# Altium PCB Wearable_ECG_230108U_230507R.PcbDoc (part 1 of 2)
Units mil, origin at the board's own origin, x right, y up, seen from the top; angles counter-clockwise.
Board outline 3795 x 1445 mil, 4 copper layers (Top Layer, L2_GND, L3_POWER, Bottom Layer), stack 62.449 mil thick; 68 components, 46 nets, 244 pads, 65 vias.
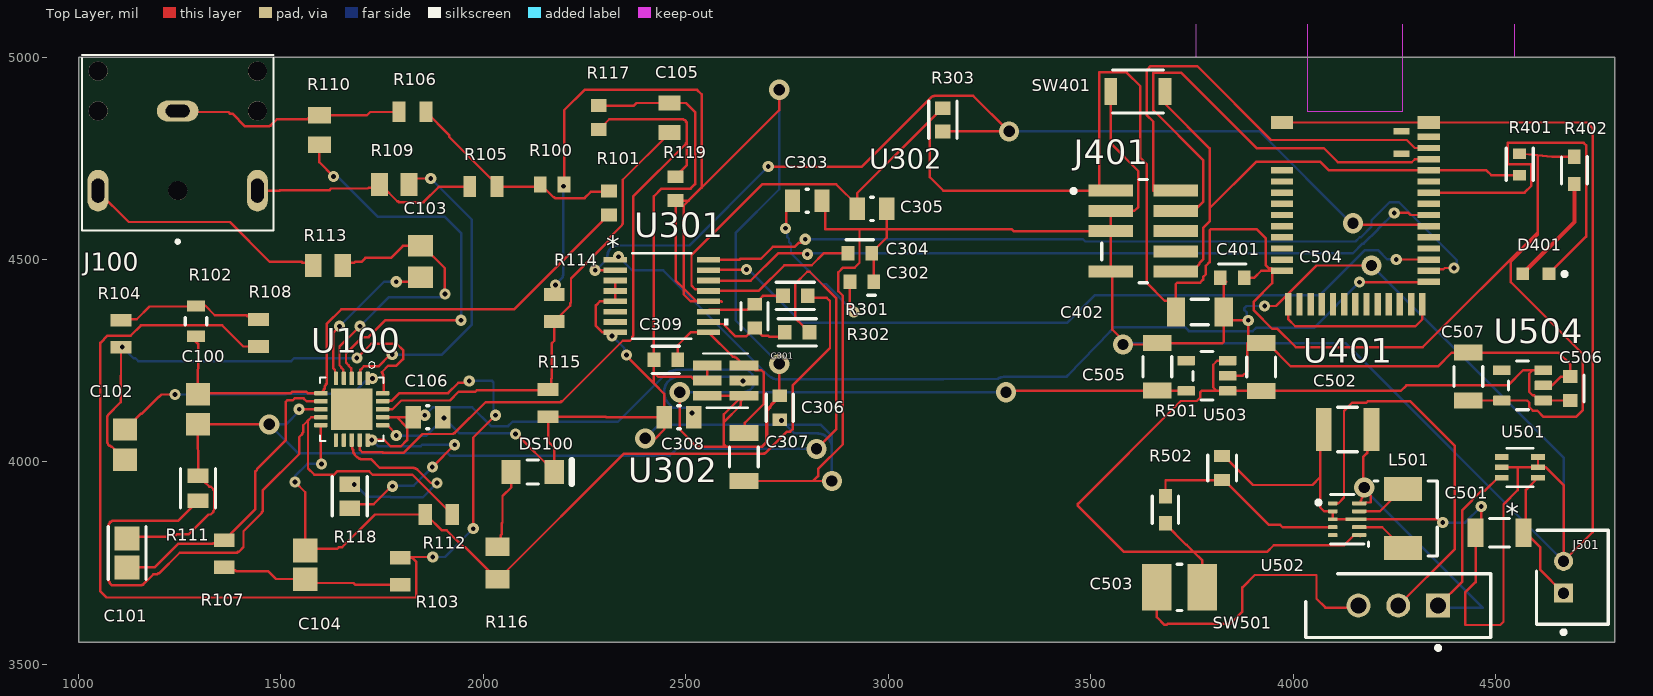
[diagram p0: Top Layer view]
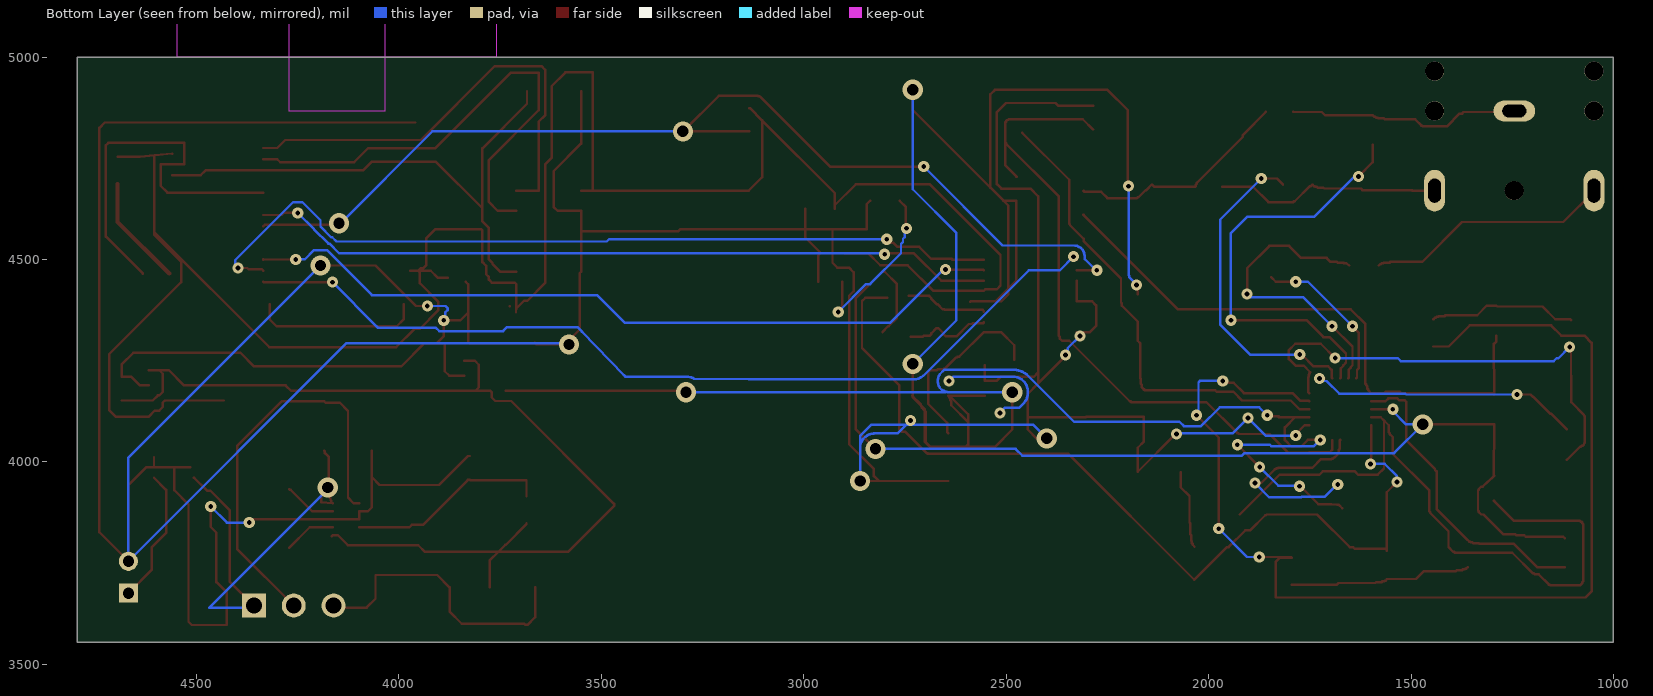
[diagram p1: Bottom Layer view, seen from below]
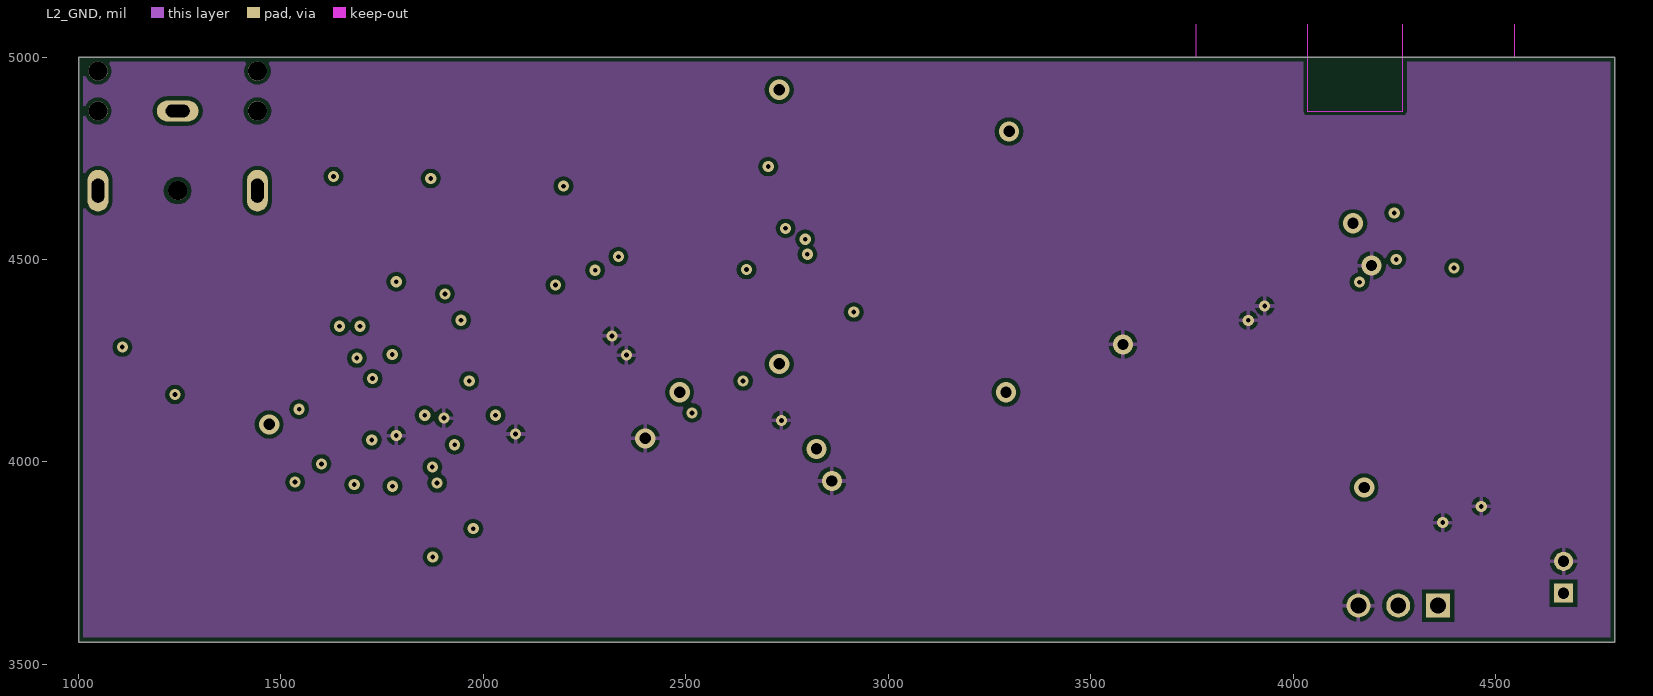
[diagram p2: L2_GND]
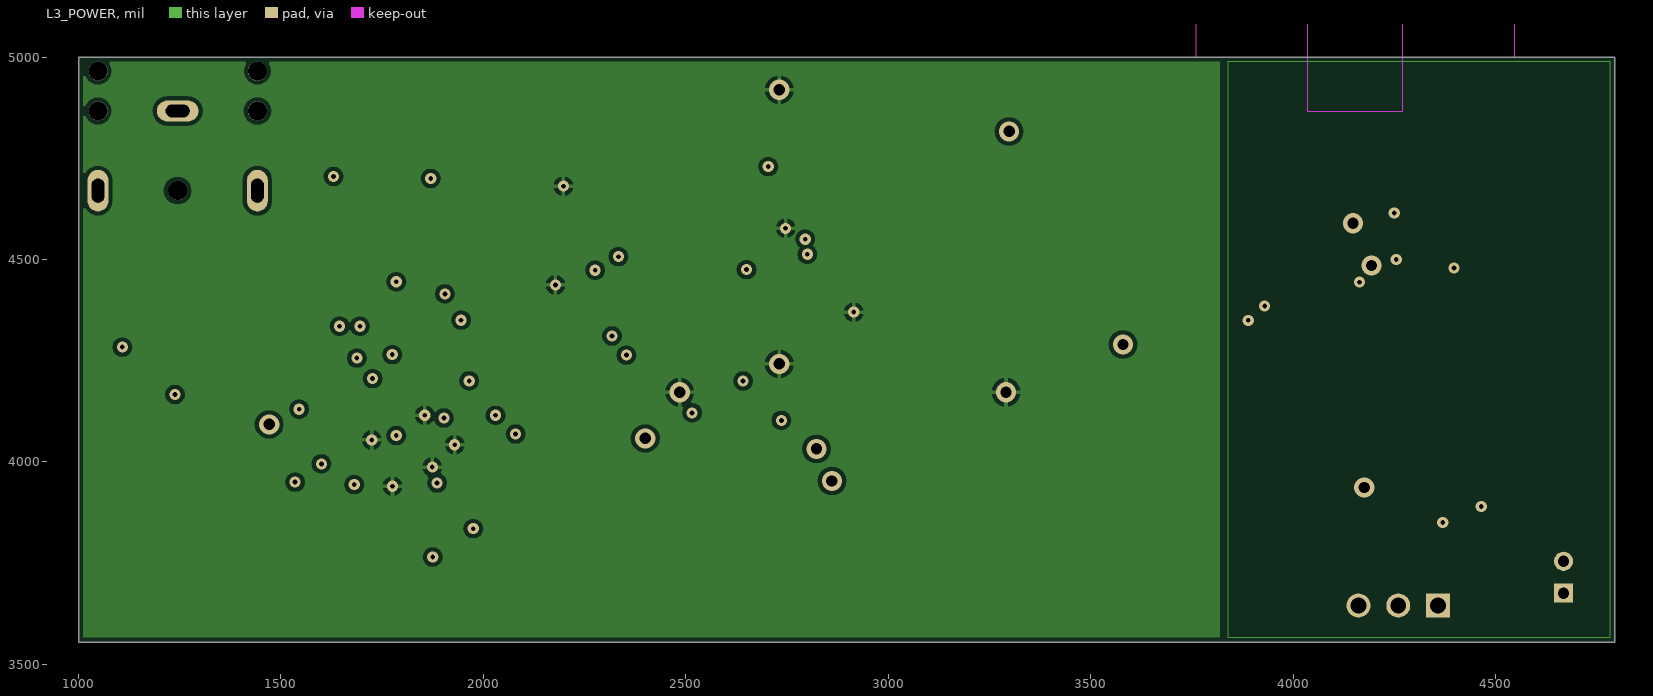
[diagram p3: L3_POWER]
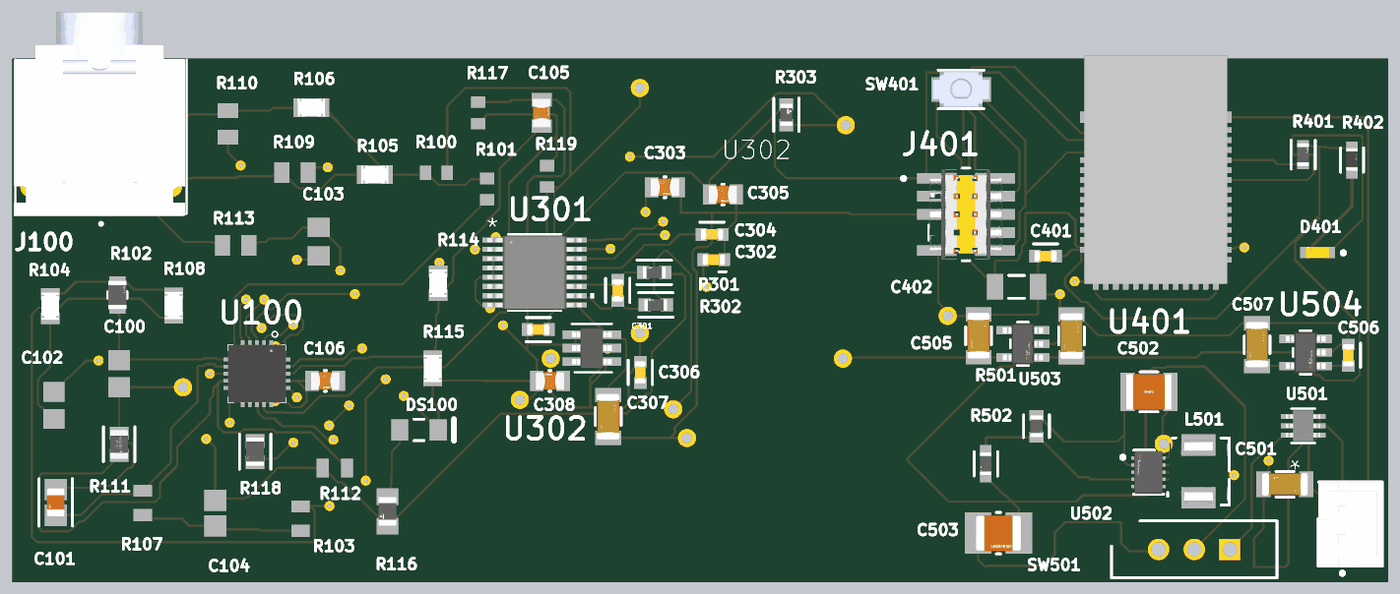
[diagram p5: 3D render of the assembled board from above, using the file's embedded part models]

## Layer stack, top to bottom
Top Solder: solder mask 0.4, Solder Resist, Dk 3.5
Top Layer: signal copper 1.378
Dielectric 2: prepreg 8.2835, PP-023, Dk 4.4
L2_GND: signal copper 0.5984
Dielectric 1: dielectric 41.9291, FR-4, Dk 4.6
L3_POWER: signal copper 0.5984
Dielectric 3: prepreg 8.2835, PP-023, Dk 4.4
Bottom Layer: signal copper 1.378
Bottom Solder: solder mask 0.4, Solder Resist, Dk 3.5

## Board outline
1000,3555 4795,3555 4795,5000 1000,5000

## Design rules (kind name [scope] priority, off if disabled: settings)
Clearance FinePitch_IC_Clearance [IsPad AND (InComponent('U100') OR InComponent('U502')) vs IsPad AND (InComponent('U100') OR InComponent('U502'))] p1: gap=7 ignorepadtopadclearanceinfootprint=FALSE
Clearance [All] p2: gap=10 ignorepadtopadclearanceinfootprint=FALSE
ComponentClearance [All] p1: gap=10 collisioncheckmode=3 verticalgap=10 showdistances=TRUE
MinimumSolderMaskSliver [All] p1: minsoldermaskwidth=7
PolygonConnect [All] p1: connectstyle=Relief reliefconductorwidth=10 reliefentries=4 polygonreliefangle="90 Angle" airgapwidth=10
RoutingLayers [All] p1: top layer_v5=TRUE mid layer 1_v5=FALSE mid layer 2_v5=FALSE bottom layer_v5=TRUE
RoutingVias FinePitch_Fanout_0p7_0p3 [(InNet('3.3V') OR InNet('ADC_CS') OR InNet('ADC_DRDY') OR InNet('DVDD_3V3') OR InNet('GND') OR InNet('MCU_RESET_N') OR InNet('MCU_STATUS_LED') OR InNet('NetC100_1') OR InNet('NetC101_2') OR InNet('NetC102_1') OR InNet('NetC102_2') OR InNet('NetC103_1') OR InNet('NetC103_2') OR InNet('NetC105_1') OR InNet('NetC301_1') OR InNet('NetC301_2') OR InNet('NetL501_1') OR InNet('NetL501_2') OR InNet('NetR103_2') OR InNet('NetR109_2') OR InNet('NetR110_2') OR InNet('NetR111_1') OR InNet('NetR117_1') OR InNet('NetR118_2') OR InNet('NetR501_1') OR InNet('NetSW501_2') OR InNet('REFOUT') OR InNet('SIGNAL_OUT') OR InNet('SPI_MISO') OR InNet('SPI_MOSI') OR InNet('SPI_SCK') OR InNet('SWDCLK') OR InNet('SWDIO') OR InNet('VBAT') OR InNet('VBAT_PROT') OR InNet('VBOOST_3V6') OR InNet('VREF_2V5')) OR InNet('NetC308_1')] p1: holewidth=11.81 width=27.56 viastyle="Through Hole" minholewidth=11.81 minwidth=27.56 maxholewidth=28 maxwidth=50 // Compact through vias for fine-pitch fanout: 0.7mm copper, 0.3mm drill, 0.2mm annulus. Fabricator capability remains to be confirmed before release.
RoutingVias [All] p2: holewidth=28 width=50 viastyle="Through Hole" minholewidth=28 minwidth=50 maxholewidth=28 maxwidth=50
SolderMaskExpansion [All] p1: expansion=0 istentingtop=FALSE
SupplyNets "Schematic Supply Nets" [InNet('GND')] p1: voltage=0.000
Width FinePitch_Escape_6mil [InNet('3.3V') OR InNet('ADC_CS') OR InNet('ADC_DRDY') OR InNet('DVDD_3V3') OR InNet('GND') OR InNet('MCU_RESET_N') OR InNet('MCU_STATUS_LED') OR InNet('NetC100_1') OR InNet('NetC101_2') OR InNet('NetC102_1') OR InNet('NetC102_2') OR InNet('NetC103_1') OR InNet('NetC103_2') OR InNet('NetC105_1') OR InNet('NetC301_1') OR InNet('NetC301_2') OR InNet('NetL501_1') OR InNet('NetL501_2') OR InNet('NetR103_2') OR InNet('NetR109_2') OR InNet('NetR110_2') OR InNet('NetR111_1') OR InNet('NetR117_1') OR InNet('NetR118_2') OR InNet('NetR501_1') OR InNet('NetSW501_2') OR InNet('REFOUT') OR InNet('SIGNAL_OUT') OR InNet('SPI_MISO') OR InNet('SPI_MOSI') OR InNet('SPI_SCK') OR InNet('SWDCLK') OR InNet('SWDIO') OR InNet('VBAT') OR InNet('VBAT_PROT') OR InNet('VBOOST_3V6') OR InNet('VREF_2V5')] p1: maxlimit=30 minlimit=6 preferedwidth=10 toplayer_prefwidth=6 midlayer1_minwidth=10 midlayer1_maxwidth=10 midlayer2_minwidth=10 midlayer2_maxwidth=10 bottomlayer_prefwidth=6 minimp=50.000000 maximp=50.000000 favimp=50.000000 // 6mil escapes on fine-pitch device nets; original 6mil minimum and 30mil maximum preserved. Power necks require widening after escape.
Width [All] p2: maxlimit=30 minlimit=6 preferedwidth=10
27 further rules are at their usual default settings.

## Classes and differential pairs
component class 05_Power_Management: C501 C502 C503 C504 C505 C506 C507 J501 L501 R501 R502 SW501 U501 U502 U503 U504
component class 04_MCU_BLE: C401 C402 D401 J401 R401 R402 SW401 U401
component class 03_ADC_Reference: C301 C302 C303 C304 C305 C306 C307 C308 C309 R301 R302 R303 U301 U302
component class 01_ECG_Input_AFE: C100 C101 C102 C103 C104 C105 C106 DS100 J100 R100 R101 R102 R103 R104 R105 R106 R107 R108 R109 R110 R111 R112 R113 R114 R115 R116 R117 R118 R119 U100

## Components (designator, comment, footprint, x,y, rotation, side; value= is the part's Value field where it differs from the comment)
C100 "0.33 uF" CAPC2013X135X45ML10T25 1295,4130 r270 top
C101 "10nF" FP-0805-L_2_01_0_2-W_1_25-IPC_A 1120,3775 r270 top
C102 "0.33 uF" CAPC2013X135X45ML10T25 1115,4042.6 r270 top
C103 "1 nF" CAPC0805(2012)100_M 1845,4495 r270 top value=1nF
C104 "1.5nF" CAPC2013X140X50ML20T25 1560,3745.43 r270 top
C105 "0.1uF" FP-CC0805-0_85-MFG 2460,4850 r90 top value="100 nF"
C106 "0.1uF" FP-CC0805-0_85-MFG 1863.19,4110.31 r0 top value="100 nF"
C301 "100nf" FP-CC0603-DA-MFG 2670,4360 r270 top value="100 nF"
C302 "100 nF, X7R" FP-CC0603-DA-MFG 2935,4445 r0 top value="100 nF"
C303 "1 µF, X7R" FP-CC0805-0_85-MFG 2800,4645 r0 top value="1 uF"
C304 "100 nF, X7R" FP-CC0603-DA-MFG 2930,4515 r0 top value="100 nF"
C305 "1 µF, X7R" FP-CC0805-0_85-MFG 2960,4625 r0 top value="1 uF"
C306 "CC0603KRX7R6BB104" FP-CC0603-DA-MFG 2732.28,4133.86 r90 top value="100 nF"
C307 "CC1206KKX7R6BB105" FP-CC1206-1_25-MFG 2643.7,4011.81 r90 top value="1 uF"
C308 "CC0805KKX7R7BB105" FP-CC0805-0_85-MFG 2483.27,4110.24 r180 top value="1 uF"
C309 "CC0603KRX7R6BB104" FP-CC0603-DA-MFG 2450.79,4251.97 r0 top value="100 nF"
C401 "100 nF, X7R, 10 V, 0603" FP-CC0603-DA-MFG 3850,4455 r180 top value="100 nF"
C402 "10 µF, X7R, 10 V" CAPC1206(3216)190_N 3770,4370 r180 top value=10uF
C501 "CC1206MKX7R6BB225" FP-CC1206-1_25-MFG 4510,3825 r180 top value="2.2 uF"
C502 "CC1210MKX7R9BB106" FP-CC1210-GD-MFG 4135,4080 r0 top
C503 "CL32B226MOJNNNE" FP-CL32-IPC_A 3720,3690 r0 top
C504 "CC1206KKX7R6BB105" FP-CC1206-1_25-MFG 3921.26,4234.25 r90 top value="1 uF"
C505 "CC1206MKX7R6BB225" FP-CC1206-1_25-MFG 3665,4235 r270 top value="2.2 uF"
C506 "CC0603KRX7R5BB105" FP-CC0603-DA-MFG 4685.04,4181.1 r90 top value="1 uF"
C507 "CC1206MKX7R6BB225" FP-CC1206-1_25-MFG 4433.07,4210.63 r90 top value="2.2 uF"
D401 "APT1608CGCK" FP-APT1608CGCK-MFG 4600,4465 r180 top
DS100 "LED" LUMX-SML-LX1206IC_V 2121.85,3975 r0 top
J100 "3.5mm Audio" CUI_SJ1-3523N 1245,4866.85 r180 top
J401 "FTSH-105-01-L-DV-007-K" FP-FTSH-105-01-L-DV-007-K-MFG 3630,4570 r270 top
J501 "B2B-PH-KL(LF)(SN)" FP-B2B-PH-KL_LF_SN-MFG 4690,3715 r270 top
L501 "SRP4020TA-R47M" FP-SRP4020TA-MFG 4271.65,3860.24 r90 top
R100 "0 ohm" RESC1608X55X25ML10T15 2170,4685 r180 top
R101 "DNP" RESC1608X55X25ML10T15 2310,4639.53 r270 top
R102 "1.4M" FP-ESR10-MFG 1290,4347.6 r270 top
R103 "1M" RESC0805(2012)_L 1795,3730 r90 top value="1000000.00 Ohm"
R104 "10M" FP-CRCW0805-e3-IPC_C 1105,4316.5 r90 top
R105 "10M" FP-CRCW0805-e3-IPC_C 2000,4680 r0 top
R106 "10M" FP-CRCW0805-e3-IPC_C 1825,4865 r0 top
R107 "1M" RESC0805(2012)_L 1360,3773.46 r90 top value="1000000.00 Ohm"
R108 "10M" FP-CRCW0805-e3-IPC_C 1445,4318.5 r90 top
R109 "180k" RESC2013X60X30NL20T20 1780,4685 r0 top
R110 "180k" RESC2013X60X30NL20T20 1595,4820 r270 top
R111 "100K" FP-CRGCQ0805-IPC_C 1295,3935 r90 top value=100KΩ
R112 "1M" RESC0805(2012)_L 1890,3870 r0 top value="1000000.00 Ohm"
R113 "360K" RESC2013X60X30NL20T20 1616.42,4485 r0 top
R114 "10M" FP-CRCW0805-e3-IPC_C 2175,4380 r270 top
R115 "10M" FP-CRCW0805-e3-IPC_C 2160,4145 r90 top
R116 "1k" FP-MCU0805-IPC_A 2035,3750 r270 top
R117 "0 ohm" RESC1608X55X25ML10T15 2285,4850.47 r90 top
R118 "10K" FP-TFCR0805-IPC_C 1670,3915 r90 top
R119 "DNP" RESC1608X55X25ML10T15 2475,4675 r270 top
R301 "1k" FP-AC0603-IPC_B 2770.58,4410 r180 top
R302 "1k" FP-AC0603-IPC_B 2775,4320 r180 top
R303 "10K" FP-MCT0603-IPC_B 3135,4845 r90 top
R401 "10K" FP-AC0603-IPC_C 4560,4735 r90 top
R402 "RT0603FRD072K2L" FP-RT0603-MFG 4695,4720 r90 top value=2.2KΩ
R501 "AC0603FR-07562KL" FP-AC0603-MFG 3685,3881.54 r270 top
R502 "CRCW060391K0FKEC" FP-CRCW0603-e3-MFG 3825,3985 r270 top
SW401 "B3U-1000P" FP-B3U-1000P-MFG 3616.93,4915 r180 top
SW501 "EG1218" ESWI-EG1218_V 4260,3645 r180 top
U100 "AD8232ACPZ-R7" QFN50P400X400X100-21N 1675,4130 r270 top
U301 "ADS1220IPW" PW16 2440.94,4409.45 r0 top
U302 "REF35250QDBVR" DBV0006A-IPC_A 2598.41,4200.79 r0 top
U401 "MDBT42Q-512KEN" MDBT42Q 4153.9,5003.58 r0 top
U501 "LM66100DCKR" DCK6_TEX 4560.49,3986.42 r180 top
U502 "TPS63802DLAR" FP-DLA0010A-MFG 4133.86,3858.27 r0 top
U503 "TPS7A2033PDBVR" FP-DBV0005A-MFG 3787.4,4212.6 r180 top
U504 "TPS7A2033PDBVR" FP-DBV0005A-MFG 4566.93,4188.98 r180 top

## Footprints (in the part's own frame and the unit in brackets; to place one, negate y for a bottom-side part, rotate by r counter-clockwise, add the part's x,y. Pads: shape width x height; smd on the part's side, far side on the other; paste and mask are expansions set on the pad)
CAPC0805(2012)100_M [mm] "Chip Capacitor, Body 2.0x1.2mm, Height 1.0mm, IPC Low Density"
  rect 1.35x1.55 smd: 1(-1,0) 2(1,0)
  body extent -1.1,-0.72 1.1,0.72, height 1
CAPC1206(3216)190_N [mm] "Chip Capacitor, Body 3.2x1.6mm, Height 1.9mm, IPC Medium Density"
  rect 1.15x1.8 smd: 1(-1.5,0) 2(1.5,0)
  silkscreen extent -0.55,-0.8 0.55,0.8, body extent -1.7,-0.9 1.7,0.9, height 1.9
CAPC2013X135X45ML10T25 [mm] "Chip Capacitor, 2-Leads, Body 2.00x1.25mm, IPC Low Density"
  rect 1.4x1.5 smd: 1(-0.95,0) 2(0.95,0)
  body extent -1.05,-0.67 1.05,0.67, height 1.35
CAPC2013X140X50ML20T25 [mm] "Chip Capacitor, 2-Leads, Body 2.00x1.25mm, IPC Low Density"
  rect 1.5x1.55 smd: 1(-0.9,0) 2(0.9,0)
  body extent -1.1,-0.72 1.1,0.72, height 1.4
CUI_SJ1-3523N [mm]
  oval 2.616x1.308 hole 0.8 slot 1.5 at 0 deg: 1(0,0)
  oval 1.308x2.616 hole 0.8 slot 1.5 at 90 deg: 2(5,5) 3(-5,5)
  round 1.2 hole 1.2 unplated: ""(-5,-2.5) ""(-5,0) ""(0,5) ""(5,-2.5) ""(5,0)
  silkscreen extent -6,-3.5 6,8.3, body extent -5.9,-6.64 6.1,7.66, height 3.01
DBV0006A-IPC_A [mm]
  rect 1.805x0.61 smd paste+0 mask+0: 1(-1.15,0.95) 2(-1.15,0) 3(-1.15,-0.95) 4(1.15,-0.95) 5(1.15,0) 6(1.15,0.95)
  silkscreen extent -1.4,-1.7 1.4,1.7, body extent -1.4,-1.45 1.4,1.45, height 1.2
DCK6_TEX [mil]
  rect 33.5x14 smd paste+0 mask+0: 1(-44.75,25.59) 2(-44.75,0) 3(-44.75,-25.59) 4(44.75,-25.59) 5(44.75,0) 6(44.75,25.59)
  silkscreen extent -33,-48 33,47, body extent -48,-43 48,43, height 43
ESWI-EG1218_V [mm] "THD, 3-Leads, Body 11.6x4mm, Pitch 2.5mm"
  rect 1.5x1.5 hole 1: 1(-2.5,0)
  round 1.5 hole 1: 2(0,0) 3(2.5,0)
  silkscreen extent -5.8,-2 5.8,2.77, body extent -5.8,-2 5.8,2, height 7.4
FP-0805-L_2_01_0_2-W_1_25-IPC_A [mil]
  rect 59.24x61.27 smd paste+0 mask+0: 1(-35.66,0) 2(35.66,0)
  silkscreen extent -65,-46 65,46, body extent -85,-50 85,50, height 10
FP-AC0603-IPC_B [mil]
  rect 33.81x35.91 smd paste+0 mask+0: 1(-30.58,0) 2(30.58,0)
  silkscreen extent -47,-34 47,34, body extent -57,-28 57,28, height 10
FP-AC0603-IPC_C [mil]
  rect 25.93x31.97 smd paste+0 mask+0: 1(-26.64,0) 2(26.64,0)
  silkscreen extent -40,-33 40,33, body extent -44,-22 44,22, height 10
FP-AC0603-MFG [mm]
  rect 0.9x0.8 smd paste+0 mask+0: 1(-0.85,0) 2(0.85,0)
  silkscreen extent -0.85,-0.83 0.85,0.83, body extent -1.4,-0.55 1.4,0.55, height 0.25
FP-APT1608CGCK-MFG [mm]
  rect 0.8x0.8 smd paste+0 mask+0: 1(-0.825,0) 2(0.825,0)
  silkscreen extent -1.92,-0.1 -1.68,0.15, body extent -1.33,-0.55 1.33,0.55, height 0.25
FP-B2B-PH-KL_LF_SN-MFG [mm]
  rect 1.2x1.2 hole 0.7 paste-2539.97 mask+0: 1(1,-0.55)
  round 1.2 hole 0.7 paste-2539.97 mask+0: 2(-1,-0.55)
  silkscreen extent -2.95,-2.25 3.57,2.25, body extent -3.05,-2.35 3.05,2.35, height 0.25
FP-B3U-1000P-MFG [mm]
  rect 0.8x1.7 smd paste+0 mask+0: 1(-1.7,0) 2(1.7,0)
  silkscreen extent -1.6,-1.35 1.6,1.35, body extent -2.2,-1.45 2.2,1.45, height 0.25
FP-CC0603-DA-MFG [mm]
  rect 0.8x0.9 smd paste+0 mask+0: 1(-0.75,0) 2(0.75,0)
  silkscreen extent -0.85,-0.85 0.85,0.85, body extent -1.35,-0.75 1.35,0.75, height 0.25
FP-CC0805-0_85-MFG [mm]
  rect 0.95x1.4 smd paste+0 mask+0: 1(-0.925,0) 2(0.925,0)
  body extent -1.6,-1.05 1.6,1.05, height 0.25
FP-CC1206-1_25-MFG [mm]
  rect 1x1.8 smd paste+0 mask+0: 1(-1.5,0) 2(1.5,0)
  silkscreen extent -0.63,-0.9 0.63,0.9, body extent -2.2,-1.25 2.2,1.25, height 0.25
FP-CC1210-GD-MFG [mm]
  rect 1x2.7 smd paste+0 mask+0: 1(-1.5,0) 2(1.5,0)
  silkscreen extent -0.63,-1.4 0.62,1.4, body extent -2.32,-1.83 2.32,1.83, height 0.25
FP-CL32-IPC_A [mil]
  rect 72.94x114.34 smd paste+0 mask+0: 1(-56.11,0) 2(56.11,0)
  silkscreen extent -6,-57 6,57, body extent -112,-77 112,77, height 10
FP-CRCW0603-e3-MFG [mm]
  rect 0.75x1 smd paste+0 mask+0: 1(-0.75,0) 2(0.75,0)
  silkscreen extent -0.8,-0.9 0.8,0.9, body extent -1.22,-0.6 1.22,0.6, height 0.25
FP-CRCW0805-e3-IPC_C [mil]
  rect 31.75x51.5 smd paste+0 mask+0: 1(-33.5,0) 2(33.5,0)
  body extent -53,-31 53,31, height 10
FP-CRGCQ0805-IPC_C [mil]
  rect 35.67x51.57 smd paste+0 mask+0: 1(-30.55,0) 2(30.55,0)
  silkscreen extent -48,-43 48,43, body extent -52,-31 52,31, height 10
FP-DBV0005A-MFG [mm]
  rrect17% 1.1x0.6 smd paste+0 mask+0: 1(-1.3,0.95) 2(-1.3,0) 3(-1.3,-0.95) 4(1.3,-0.95) 5(1.3,0.95)
  silkscreen extent -0.38,-1.53 0.88,1.52, body extent -1.95,-1.78 1.95,1.78, height 0.25
FP-DLA0010A-MFG [mm]
  rrect40% 0.6x0.25 smd paste+0 mask+0: 1(-0.9,1) 2(-0.9,0.5) 3(-0.9,0) 4(-0.9,-0.5) 5(-0.9,-1)
  rrect40% 0.9x0.25 smd paste+0 mask+0: 6(0.75,-1) 7(0.75,-0.5) 9(0.75,0.5) 10(0.75,1)
  rrect40% 1.3x0.25 smd paste-1000 mask+0: 8(0.55,0)
  silkscreen extent -1.92,-1.55 1.05,1.55, body extent -1.3,-1.65 1.3,1.65, height 0.25
FP-ESR10-MFG [mm]
  rect 0.7x1.15 smd paste+0 mask+0: 1(-0.95,0) 2(0.95,0)
  silkscreen extent -0.22,-0.67 0.23,0.67, body extent -1.4,-0.77 1.4,0.77, height 0.25
FP-FTSH-105-01-L-DV-007-K-MFG [mm]
  rect 0.74x2.79 smd paste+0 mask+0: 1(-2.54,-2.035) 2(-2.54,2.035) 3(-1.27,-2.035) 4(-1.27,2.035) 5(0,-2.035) 6(0,2.035) 8(1.27,2.035) 9(2.54,-2.035) 10(2.54,2.035)
  silkscreen extent -3.24,-4.49 3.24,0.27, body extent -3.34,-3.53 3.34,3.53, height 0.25
FP-MCT0603-IPC_B [mil]
  rect 34x37.88 smd paste+0 mask+0: 1(-28.72,0) 2(28.72,0)
  silkscreen extent -46,-35 46,35, body extent -56,-29 56,29, height 10
FP-MCU0805-IPC_A [mil]
  rect 45.62x59.38 smd paste+0 mask+0: 1(-40.42,0) 2(40.42,0)
  body extent -83,-49 83,49, height 10
FP-RT0603-MFG [mm]
  rect 0.9x0.8 smd paste+0 mask+0: 1(-0.85,0) 2(0.85,0)
  silkscreen extent -0.85,-0.81 0.86,0.8, body extent -1.4,-0.55 1.4,0.55, height 0.25
FP-SRP4020TA-MFG [mm]
  rect 1.5x2.4 smd paste+0 mask+0: 1(-1.85,0) 2(1.85,0)
  silkscreen extent -2.35,-2.15 2.35,2.15, body extent -2.7,-2.25 2.7,2.25, height 0.25
FP-TFCR0805-IPC_C [mil]
  rect 37.63x51.5 smd paste+0 mask+0: 1(-29.58,0) 2(29.58,0)
  silkscreen extent -48,-43 48,43, body extent -52,-31 52,31, height 10
LUMX-SML-LX1206IC_V [mm] "SMD, 2-Leads, Body 3.2x1.5mm"
  rect 1.2x1.5 smd: 1(-1.35,0) 2(1.35,0)
  silkscreen extent -0.35,-0.75 2.45,0.75, body extent -1.6,-0.8 1.6,0.8, height 1.1
MDBT42Q [mm]
  rect 1.4x0.8 smd mask+0: 1(-4.6,-4.2) 39(4.6,-4.2)
  rect 1.4x0.4 smd mask+0: 2(-4.6,-7.2) 3(-4.6,-7.9) 4(-4.6,-8.6) 5(-4.6,-9.3) 6(-4.6,-10) 7(-4.6,-10.7) 8(-4.6,-11.4) 9(-4.6,-12.1) 10(-4.6,-12.8) 11(-4.6,-13.5) 25(4.6,-14.2) 26(4.6,-13.5) 27(4.6,-12.8) 28(4.6,-12.1) 29(4.6,-11.4) 30(4.6,-10.7) 31(4.6,-10) 32(4.6,-9.3) 33(4.6,-8.6) 34(4.6,-7.9) 35(4.6,-7.2) 36(4.6,-6.5) 37(4.6,-5.8) 38(4.6,-5.1)
  rect 0.4x1.4 smd mask+0: 12(-4.2,-15.6) 13(-3.5,-15.6) 14(-2.8,-15.6) 15(-2.1,-15.6) 16(-1.4,-15.6) 17(-0.7,-15.6) 18(0,-15.6) 19(0.7,-15.6) 20(1.4,-15.6) 21(2.1,-15.6) 22(2.8,-15.6) 23(3.5,-15.6) 24(4.2,-15.6)
  rect 1x0.4 smd mask+0: 40(2.9,-4.75) 41(2.9,-6.15)
  body extent -5,-15.87 5,0.13, height 2.2
PW16 [mil]
  rect 57.56x13.97 smd paste+0 mask+0: 1(-115,89.57) 2(-115,63.98) 3(-115,38.39) 4(-115,12.8) 5(-115,-12.79) 6(-115,-38.38) 7(-115,-63.98) 8(-115,-89.57) 9(115,-89.57) 10(115,-63.98) 11(115,-38.38) 12(115,-12.79) 13(115,12.8) 14(115,38.39) 15(115,63.98) 16(115,89.57)
  silkscreen extent -73,-106 164,105, body extent -130,-101 130,101, height 47
QFN50P400X400X100-21N [mm]
  rrect25% 0.84x0.26 smd: 1(-1.935,1) 2(-1.935,0.5) 3(-1.935,0) 4(-1.935,-0.5) 5(-1.935,-1) 11(1.935,-1) 12(1.935,-0.5) 13(1.935,0) 14(1.935,0.5) 15(1.935,1)
  rrect25% 0.26x0.84 smd: 6(-1,-1.935) 7(-0.5,-1.935) 8(0,-1.935) 9(0.5,-1.935) 10(1,-1.935) 16(1,1.935) 17(0.5,1.935) 18(0,1.935) 19(-0.5,1.935) 20(-1,1.935)
  rect 2.63x2.63 smd paste-2: 21(0,0)
  silkscreen extent -2.98,-2 2,2, body extent -2.05,-2.05 2.05,2.05, height 0.6
RESC0805(2012)_L [mm] "Chip Resistor, Body 2.0x1.3mm, IPC High Density"
  rect 0.85x1.3 smd: 1(-0.85,0) 2(0.85,0)
  body extent -1.1,-0.67 1.1,0.68, height 0.7
RESC1608X55X25ML10T15 [mm] "Chip Resistor, 2-Leads, Body 1.60x0.80mm, IPC Low Density"
  rect 0.8x1 smd: 1(-0.75,0) 2(0.75,0)
  body extent -0.85,-0.45 0.85,0.45, height 0.55
RESC2013X60X30NL20T20 [mm] "Chip Resistor, 2-Leads, Body 2.00x1.25mm, IPC Medium Density"
  rect 1.05x1.45 smd: 1(-0.925,0) 2(0.925,0)
  body extent -1.1,-0.72 1.1,0.72, height 0.6

## Part data
C100 C102: library part CMP-2007-03570-1, Manufacturer=Murata, Part Number=GRM21BR71E334KA01K
C101: library part CMP-04427-005637-1, "General Purpose Ceramic Capacitor, 0805, 10nF, 10%, X8R, 15%, 50V", Case/Package=0805, Dielectric=X8R, Max Operating Temperature=150°C, Min Operating Temperature=-55°C, Tolerance=10%, Voltage=50V, Capacitance=10nF, Depth=1.25mm, Height=0.94mm, Length=2.01mm, REACH SVHC="No SVHC", RoHS Compliant=Yes, Series=FlEXITERM, Termination=SMD/SMT, Voltage Rating (DC)=50V
C103: library part CMP-1036-02962-1, "CAP 1nF 16V ±20% 0805 (2012 Metric) Thickness 1mm SMD", Case-EIA=0805, Case-Metric=2012, Rated Voltage="16 V", Tolerance=Â±20%, Max Thickness="1 mm", Technology=SMT
C104: library part CMP-2007-04787-1, Manufacturer="AVX Interconnect / Elco", Part Number=08055F152KAT2A
C105 C106: library part CMP-03422-000402-1, "CC0805 100 nF X7R 20.00% 16 V", Capacitance="100 nF", Manufacturer=Yageo, Manufacturer Part Number=CC0805MRX7R7BB104, Package=CC0805-0.85, Temperature="-30°C to +85°C", Temperature Characteristic=X7R, Temperature Range High=+85°C, Temperature Range Low=-30°C, Tolerance=0.2, Voltage Rating="16 V", Automotive=No, Category=Cap, ComponentLink2Description=Datasheet, ComponentLink2URL=http://www.yageo.com/documents/recent/UPY-GPHC_Y5V_6.3V-to-50V_8.pdf, Device Class L1="Passive Components", Device Class L2=Capacitors, Device Class L3="Ceramic Capacitors", Footprint Url=http://www.yageo.com/exep/pages/download/literatures/UPY-C_GEN_24.pdf, Height=0.95mm, Ipc Land Pattern Name=CAPC200125X85, Lead Free=Yes, Material=Ceramic, Octopart=https://octopart.com/cc0805mrx7r7bb104-yageo-84795387, RoHS=TRUE
C301 C304: library part CMP-03422-001228-1, "CAP CER 0.1UF 10V X7R 0603, CC0603KRX7R6BB104", Capacitance="100 nF", Manufacturer=YAGEO, Manufacturer Part Number=CC0603KRX7R6BB104, Package=CC0603-DA, Temperature="-55°C to +125°C", Temperature Characteristic=X7R, Temperature Coefficient=15%, Temperature Range High=+125°C, Temperature Range Low=-55°C, Tolerance=0.1, Voltage="10 V", Automotive=No, Category=Cap, ComponentLink2Description=Datasheet, ComponentLink2URL=http://www.yageo.com/documents/recent/UPY-GPHC_X7R_6.3V-to-50V_18.pdf, Device Class L1="Passive Components", Device Class L2=Capacitors, Device Class L3="Ceramic Capacitors", Digikey Description="CAP CER 0.1UF 10V X7R 0603", Footprint Url=http://www.yageo.com/exep/pages/download/literatures/UPY-C_GEN_24.pdf, Height=0.9mm, Lead Free=Yes, Material=Ceramic, Mouser Description="0603 0.1 uF 10 V ±10 % Tolerance X7R SMT Multilayer Ceramic Capacitor", Octopart=https://octopart.com/cc0603krx7r6bb104-yageo-9291607, RoHS=TRUE, Voltage Rating="10 V"
C302: library part CMP-03422-001228-1, "CAP CER 0.1UF 10V X7R 0603    CC0603KRX7R6BB104", Capacitance="100 nF", Manufacturer=YAGEO, Manufacturer Part Number=CC0603KRX7R6BB104, Package=CC0603-DA, Temperature="-55°C to +125°C", Temperature Characteristic=X7R, Temperature Coefficient=15%, Temperature Range High=+125°C, Temperature Range Low=-55°C, Tolerance=0.1, Voltage="10 V", Automotive=No, Category=Cap, ComponentLink2Description=Datasheet, ComponentLink2URL=http://www.yageo.com/documents/recent/UPY-GPHC_X7R_6.3V-to-50V_18.pdf, Device Class L1="Passive Components", Device Class L2=Capacitors, Device Class L3="Ceramic Capacitors", Digikey Description="CAP CER 0.1UF 10V X7R 0603", Footprint Url=http://www.yageo.com/exep/pages/download/literatures/UPY-C_GEN_24.pdf, Height=0.9mm, Lead Free=Yes, Material=Ceramic, Mouser Description="0603 0.1 uF 10 V ±10 % Tolerance X7R SMT Multilayer Ceramic Capacitor", Octopart=https://octopart.com/cc0603krx7r6bb104-yageo-9291607, RoHS=TRUE, Voltage Rating="10 V"
C303 C305: library part CMP-03422-000373-1, "CC0805 1 uF X7R 10.00% 25 V, CC0805KFX7R8BB105", Capacitance="1 uF", Manufacturer=Yageo, Manufacturer Part Number=CC0805KFX7R8BB105, Package=CC0805-0.85, Temperature="-30°C to +85°C", Temperature Characteristic=X7R, Temperature Range High=+85°C, Temperature Range Low=-30°C, Tolerance=0.1, Voltage Rating="25 V", Automotive=No, Category=Cap, ComponentLink2Description=Datasheet, ComponentLink2URL=http://www.yageo.com/documents/recent/UPY-GPHC_Y5V_6.3V-to-50V_8.pdf, Device Class L1="Passive Components", Device Class L2=Capacitors, Device Class L3="Ceramic Capacitors", Footprint Url=http://www.yageo.com/exep/pages/download/literatures/UPY-C_GEN_24.pdf, Height=0.95mm, Ipc Land Pattern Name=CAPC200125X85, Lead Free=Yes, Material=Ceramic, Mouser Description="CC Series 0805 1 uF 25 V ±10% Tolerance X7R Multilayer Ceramic Capacitor", Octopart=https://octopart.com/cc0805kfx7r8bb105-yageo-33242303, RoHS=TRUE
C306 C309: library part CMP-03422-001228-1, "CAP CER 0.1UF 10V X7R 0603", Capacitance="100 nF", Manufacturer=YAGEO, Package=CC0603-DA, Temperature="-55°C to +125°C", Temperature Characteristic=X7R, Temperature Coefficient=15%, Temperature Range High=+125°C, Temperature Range Low=-55°C, Tolerance=0.1, Voltage="10 V", Automotive=No, Category=Cap, ComponentLink2Description=Datasheet, ComponentLink2URL=http://www.yageo.com/documents/recent/UPY-GPHC_X7R_6.3V-to-50V_18.pdf, Device Class L1="Passive Components", Device Class L2=Capacitors, Device Class L3="Ceramic Capacitors", Digikey Description="CAP CER 0.1UF 10V X7R 0603", Footprint Url=http://www.yageo.com/exep/pages/download/literatures/UPY-C_GEN_24.pdf, Height=0.9mm, Lead Free=Yes, Manufacturer Part Number=CC0603KRX7R6BB104, Material=Ceramic, Mouser Description="0603 0.1 uF 10 V ±10 % Tolerance X7R SMT Multilayer Ceramic Capacitor", Octopart=https://octopart.com/cc0603krx7r6bb104-yageo-9291607, RoHS=TRUE, Voltage Rating="10 V"
C307 C504: library part CMP-03422-001171-1, "CAP CER 1UF 10V X7R 1206", Capacitance="1 uF", Manufacturer=Yageo, Package=CC1206-1.25, Temperature="-55°C to +125°C", Temperature Characteristic=X7R, Temperature Coefficient=15%, Temperature Range High=+125°C, Temperature Range Low=-55°C, Tolerance=0.1, Voltage Rating="10 V", Automotive=No, Automotive Grade=NA, Category=Cap, ComponentLink2Description=Datasheet, ComponentLink2URL=http://www.yageo.com/documents/recent/UPY-NP0X7R_HV_1KV-to-3KV_11.pdf, Device Class L1="Passive Components", Device Class L2=Capacitors, Device Class L3="Ceramic Capacitors", Digikey Description="CAP CER 1UF 10V X7R 1206", Footprint Url=http://www.yageo.com/exep/pages/download/literatures/UPY-C_GEN_24.pdf, Height=1.45mm, Lead Free=Yes, Manufacturer Part Number=CC1206KKX7R6BB105, Material=Ceramic, Mouser Description="Multilayer Ceramic Capacitors MLCC - SMD/SMT 1.0uF 10V X7R 10%", Octopart=https://octopart.com/cc1206kkx7r6bb105-yageo-21769912, RoHS=TRUE
C308: library part CMP-03422-000001-1, "CAP CER 1UF 16V X7R 0805", Capacitance="1 uF", Manufacturer=Yageo, Package=CC0805-0.85, Temperature="-30°C to +85°C", Temperature Characteristic=X7R, Temperature Range High=+85°C, Temperature Range Low=-30°C, Tolerance=0.1, Voltage Rating="16 V", Automotive=No, Category=Cap, ComponentLink2Description=Datasheet, ComponentLink2URL=http://www.yageo.com/documents/recent/UPY-GPHC_Y5V_6.3V-to-50V_8.pdf, Device Class L1="Passive Components", Device Class L2=Capacitors, Device Class L3="Ceramic Capacitors", Digikey Description="CAP CER 1UF 16V X7R 0805", Footprint Url=http://www.yageo.com/exep/pages/download/literatures/UPY-C_GEN_24.pdf, Height=0.95mm, Ipc Land Pattern Name=CAPC200125X85, Lead Free=Yes, Manufacturer Part Number=CC0805KKX7R7BB105, Material=Ceramic, Mouser Description="Multilayer Ceramic Capacitors MLCC - SMD/SMT 1.0uF 16V X7R 10%", Octopart=https://octopart.com/cc0805kkx7r7bb105-yageo-8376555, RoHS=TRUE
C401: library part CMP-03422-001228-1, "CAP CER 0.1UF 10V X7R 0603", Capacitance="100 nF", Manufacturer=YAGEO, Manufacturer Part Number=CC0603KRX7R6BB104, Package=CC0603-DA, Temperature="-55°C to +125°C", Temperature Characteristic=X7R, Temperature Coefficient=15%, Temperature Range High=+125°C, Temperature Range Low=-55°C, Tolerance=0.1, Voltage="10 V", Automotive=No, Category=Cap, ComponentLink2Description=Datasheet, ComponentLink2URL=http://www.yageo.com/documents/recent/UPY-GPHC_X7R_6.3V-to-50V_18.pdf, Device Class L1="Passive Components", Device Class L2=Capacitors, Device Class L3="Ceramic Capacitors", Digikey Description="CAP CER 0.1UF 10V X7R 0603", Footprint Url=http://www.yageo.com/exep/pages/download/literatures/UPY-C_GEN_24.pdf, Height=0.9mm, Lead Free=Yes, Material=Ceramic, Mouser Description="0603 0.1 uF 10 V ±10 % Tolerance X7R SMT Multilayer Ceramic Capacitor", Octopart=https://octopart.com/cc0603krx7r6bb104-yageo-9291607, RoHS=TRUE, Voltage Rating="10 V"
C402: library part CMP-1037-04966-1, "CAP 10uF 10V ±5% 1206 (3216 Metric) Thickness 1.9mm SMD", Case-EIA=1206, Case-Metric=3216, Rated Voltage="10 V", Tolerance=Â±5%, Max Thickness="1.9 mm", Technology=SMT
C501 C505 C507: library part CMP-03422-000380-2, "CAP CER 2.2UF 10V X7R 1206", Capacitance="2.2 uF", Manufacturer=Yageo, Package=CC1206-1.25, Temperature="-55°C to +125°C", Temperature Characteristic=X7R, Temperature Coefficient=15%, Temperature Range High=+125°C, Temperature Range Low=-55°C, Tolerance=0.2, Voltage Rating="10 V", Automotive=No, Automotive Grade=NA, Category=Cap, ComponentLink2Description=Datasheet, ComponentLink2URL=http://www.yageo.com/documents/recent/UPY-NP0X7R_HV_1KV-to-3KV_11.pdf, Device Class L1="Passive Components", Device Class L2=Capacitors, Device Class L3="Ceramic Capacitors", Digikey Description="CAP CER 2.2UF 10V X7R 1206", Footprint Url=http://www.yageo.com/exep/pages/download/literatures/UPY-C_GEN_24.pdf, Height=1.45mm, Lead Free=Yes, Manufacturer Part Number=CC1206MKX7R6BB225, Material=Ceramic, Octopart=https://octopart.com/cc1206mkx7r6bb225-yageo-57080790, RoHS=TRUE
C502: library part CMP-03422-001447-1, "CAP CER 10UF 50V X7R 1210", Capacitance=10uF, Case Code (Imperial)=1210, Case Code (Metric)=3225, Max Operating Temperature=125°C, Min Operating Temperature=-55°C, Tolerance=20%, Voltage Rating=50V, Case/Package=1210, Mount="Surface Mount", Packaging="Tape and Reel", RoHS Compliant=Yes
C503: library part CMP-13271-003818-1, "Cap Ceramic 22uF 16V X7R ±20% SMD 1210 +125°C Embossed T/R", Capacitance=22uF, Case Code (Imperial)=1210, Case Code (Metric)=3225, Dielectric=X7R, Max Operating Temperature=125°C, Min Operating Temperature=-55°C, Package Quantity=1, Tolerance=20%, Voltage Rating=16V, Case/Package=1210, Depth=2.5mm, Height=2.5mm, Length=3.2mm, Mount="Surface Mount", Packaging="Tape and Reel", Radiation Hardening=No, Thickness=0.106inch, Width=0.098inch
C506: library part CMP-03422-000406-1, "0603 1 uF 6.3 V ±10 % Tolerance X7R SMT Multilayer Ceramic Capacitor", Capacitance="1 uF", Manufacturer=YAGEO, Package=CC0603-DA, Temperature="-55°C to +125°C", Temperature Characteristic=X7R, Temperature Coefficient=15%, Temperature Range High=+125°C, Temperature Range Low=-55°C, Tolerance=0.1, Voltage="6.3 V", Automotive=No, Category=Cap, ComponentLink2Description=Datasheet, ComponentLink2URL=http://www.yageo.com/documents/recent/UPY-GPHC_X7R_6.3V-to-50V_18.pdf, Device Class L1="Passive Components", Device Class L2=Capacitors, Device Class L3="Ceramic Capacitors", Digikey Description="0603 1 uF 6.3 V ±10 % Tolerance X7R SMT Multilayer Ceramic Capacitor", Footprint Url=http://www.yageo.com/exep/pages/download/literatures/UPY-C_GEN_24.pdf, Height=0.9mm, Lead Free=Yes, Manufacturer Part Number=CC0603KRX7R5BB105, Material=Ceramic, Mouser Description="0603 1 uF 6.3 V ±10 % Tolerance X7R SMT Multilayer Ceramic Capacitor", Octopart=https://octopart.com/cc0603krx7r5bb105-yageo-11543596, RoHS=TRUE, Voltage Rating="6.3 V"
D401: library part CMP-44529-000032-1, "LED GREEN CLEAR CHIP SMD", Case Code (Imperial)=0603, Case Code (Metric)=1608, Color=Green, Forward Current=20mA, Forward Voltage=2.1V, Lens Color=Clear, Max Operating Temperature=85°C, Min Operating Temperature=-40°C, Package Quantity=2000, Power Rating=75mW, Voltage=3V, Case/Package=0603, Dominant Wavelength=570nm, Height=0.75mm, Illumination Color=Green, Lead Free="Lead Free", Length=1.6mm, Lens Style=Clear, Luminous Intensity=50mcd, Mount="Surface Mount", Number of LEDs=1, Number of Pins=2, Packaging="Tape and Reel", Test Current=20mA, Viewing Angle=120°, Width=0.8mm
DS100: library part CMP-2000-07123-1, "LED Red, 65 mW, -40 to 85 degC, 2-Pin SMD, RoHS, Tape and Reel", Color=Red, Manufacturer=Lumex, Operating Temperature=-25to85C, Package Description="2-Pin Surface Mount Device, Body 3.2 x 1.5 mm", Package Reference=SML-LX1206IC, Part No=SML-LX1206IC-TR, Reverse Voltage=5(Min)V, Supplier_Package=SMD, Datasheet URL=http://www.lumex.com/content/files/ProductAttachment/SML-LX1206IC-TR.pdf, Datasheet Version="Rev. J, 08/2012", Dimension=3.2x1.6x1.1mm, Dominant Wavelength=N/A, ECCN=EAR99, Family=SML-LX1206IC, HTS=8541402000, Intensity=6mcd, LED Material=GaAsP, Lens Appearance=ColorlessNonDiffused, Lens Dimensions=2x1.6x0.5mm, Manufacturer URL=http://www.lumexinstruments.com/, Mounting=SurfaceMount, Mounting Technology=SurfaceMount, Number of LEDs=1, Packaging=TapeandReel, Peak Wavelength=635nm, Pin_Count=2, RoHS=Unknown, Supplier=Lumex, Supplier Standard Pack=3,000, Type=Uni-Color, Viewing Angle=160
J100: library part SJ1-3523N, "3.5 mm, Stereo, Right Angle, Through Hole, 3 Conductors, 0 Internal Switches, Audio Jack Connector", Package=None, Check_prices=https://www.snapeda.com/parts/SJ1-3523N/Same+Sky/view-part/?ref=eda, MF="Same Sky", MP=SJ1-3523N, SnapEDA_Link=https://www.snapeda.com/parts/SJ1-3523N/Same+Sky/view-part/?ref=snap
J401: library part CMP-02766-000093-1, "CONN HEADER SMD 10POS 1.27MM", Current Rating=3.4A, Manufacturer=Samtec, Package=0, Temperature="-55°C to +125°C", Temperature Range High=+125°C, Temperature Range Low=-55°C, Automotive=No, Category=Conn, ComponentLink2Description=Datasheet, ComponentLink2URL=http://suddendocs.samtec.com/catalog_english/ftsh_smt.pdf, Conn Gender=Male, Conn Orientation=Vertical, Contact Material=Gold,Nickel, Device Class L1=Connectors, Device Class L2="Headers and Wire Housings", Device Class L3=unset, Digikey Description="CONN HEADER SMD 10POS 1.27MM", Footprint Url=http://suddendocs.samtec.com/prints/ftsh-1xx-xx-xxx-dv-xxx-footprint.pdf, Height=6.38mm, Lead Free=Yes, Manufacturer Part Number=FTSH-105-01-L-DV-007-K, Mouser Description="Conn Unshrouded Header HDR 10 POS 1.27mm Solder ST SMD Tube", Number of Contacts=9, Number of Rows=2, Octopart=https://octopart.com/ftsh-105-01-l-dv-007-k-samtec-53647300, Pitch=1.27mm, RoHS=TRUE, Standoff Height=0.2mm
J501: library part CMP-17439-000682-1, "Connector Header, PH Series, 2 Position, 2.00mm, Shrouded Through Hole, Press-Fit, 100V, 32-24 AWG, Solder, Gray", Flammability Rating="UL94 V-0", Insulation Color=Grey, Voltage Rating=100V, Connector Type=Header, Contact Finish - Mating=TIN, Contact Material=Brass, Contact Shape=Square, Contact Type="Male Pin", Fastening Type=Detent, Insulation Material=Nylon, Lead Free="Lead Free", Mount="Through Hole", Number of Positions=2, Number of Rows=1, Packaging=Bulk, Pitch=2mm, Series=PH, Termination=Press-Fit
L501: library part CMP-00059-47300346-1, "SRP4020TA-R47M Inductor Power Shielded Wirewound 470nH 20% 100KHz 10Q-Factor Carbonyl Powder 8A 14mOhm DCR 1616 Automotive T/R", Case/Package=SMD/SMT, Current Rating=8A, DC Resistance (DCR)=14mΩ, Inductance=470nH, Inductance Tolerance=20%, Max DC Current=12A, Max Operating Temperature=150°C, Min Operating Temperature=-55°C, Ratings=AEC-Q200, Self Resonant Frequency=120MHz, Test Frequency=100kHz, Composition=Wirewound, Core Material="Carbonyl Powder", Depth=4.06mm, Height=1.8mm, Height - Seated (Max)=2.0066mm, Length=4.445mm, Mount="Surface Mount", NexarPartId=47300346, Number of Pins=2, Packaging="Tape & Reel (TR)", Q Factor=10, REACH SVHC="No SVHC", RMS Current (Irms)=8A, RoHS=Compliant, Saturation Current=12A, Schedule B="8504500000, 8504500000", Series Resistance=14mΩ, Shielding=Shielded, Termination=SMD/SMT, Tolerance=20%, Weight=149.997327mg, Width=4.06mm
R100 R101 R117 R119: library part CMP-2100-03667-1, "Chip Resistor, 0 Ohm, +/- 5%, 0.1 W, -55 to 155 degC, 0603 (1608 Metric), RoHS, Tape and Reel", Case Code (Imperial)=0603, Case Code (Metric)=1608, Manufacturer=Yageo, Max Operating Temperature=155degC, Min Operating Temperature=-55degC, Package Description="2-Pin Surface Mount Device, Body 1.6 x 0.8 mm", Package Quantity=5000, Power Rating=100mW, Resistance=0mOhm, Temperature Coefficient=200ppm/degreesC, Tolerance=5%, Voltage Rating=50V, Case/Package=0603, Composition=ThickFilm, Contact Plating=Tin, Datasheet URL=http://www.yageo.com/NewPortal/yageodocoutput?fileName=/pdf/R-Chip/PYu-RC_Group_51_RoHS_L_5.pdf, Datasheet Version="Rev. 5, 10/2016", Depth=0.8mm, Height=0.45mm, Lead Free=LeadFree, Length=1.6mm, Manufacturer URL=http://www.yageo.com/, Military Standard=Not, Number of Pins=2, Package Reference=0603, Packaging=TapeandReel, Radiation Hardening=No, REACH SVHC=NoSVHC, RoHSCompliant=true, Termination=SMD/SMT, Voltage Rating (DC)=50V, Width=0.8mm
R102: library part CMP-08839-004808-1, "1.4MΩ ±1% 0.4W 0805 Anti-Surge Chip Resistor AEC-Q200", Case/Package=0805, Max Operating Temperature=155°C, Max Power Dissipation=400mW, Min Operating Temperature=-55°C, Package Quantity=5000, Resistance=1.4MR, Resistor Type="Thick Film", Temperature Coefficient=100ppm/°C, Tolerance=1%, Features="Automotive AEC-Q200", Height=0.026inch, Length=0.079inch, Number of Terminations=2, Packaging="Tape and Reel", RoHS Compliant=Yes, Series=ESR10, Width=0.049inch
R103 R107 R112: library part CMP-1013-00146-1, "1M 0.125W 5% 0805 (2012 Metric)  SMD", Case-EIA=0805, Case-Metric=2012, Power="0.125 W", Tolerance="5 %", Technology=SMT
R104 R105 R106 R108 R114 R115: library part CMP-2001-04913-2, "RES Thick Film, 10MΩ, 1%, 0.125W, 100ppm/°C, 0805", Case Code (Imperial)=0805, Case Code (Metric)=2012, Max Operating Temperature=155°C, Max Power Dissipation=125mW, Min Operating Temperature=-55°C, Package Quantity=10, Resistance=10MR, Temperature Coefficient=100ppm/°C, Tolerance=5%, Voltage Rating=150V, Case/Package=0805, Composition="Thick Film", Contact Plating=Tin, Depth=1.25mm, Features="Automotive AEC-Q200", Height=0.02inch, Lead Free="Lead Free", Length=2mm, Military Standard=Not, Mount="Surface Mount", Number of Terminations=2, Packaging="Tape and Reel", Power Rating=125mW, Radiation Hardening=No, Termination=SMD/SMT, Voltage Rating (DC)=150V, Weight=0.000194oz, Width=0.049inch
R109 R110 R113: library part CMP-2001-04645-1, Manufacturer="KOA Speer", Part Number=RK73B2ATTD364J
R111: library part CMP-03211-000816-1, "CRGCQ 0805 100K 1%", Ambient Temperature Range High=+70°C, Manufacturer="TE Connectivity", Manufacturer Part Number=CRGCQ0805F100K, Package=CRGCQ0805, Power Rating=0.125W, Resistance=100KΩ, Temperature="-55°C to +155°C", Temperature Coefficient=±100ppm/°C, Temperature Range High=+155°C, Temperature Range Low=-55°C, Tolerance=0.01, Voltage Rating=150V, Automotive=Yes, Automotive Grade="Grade 1141", Category=Res, ComponentLink2Description=Datasheet, ComponentLink2URL=https://www.te.com/commerce/DocumentDelivery/DDEController?Action=showdoc&DocId=Data+Sheet%7F1773204-3%7F1%7Fpdf%7FEnglish%7FENG_DS_1773204-3_1.pdf%7F4-2176341-1150, Composition="Thick Film", Device Class L1="Passive Components", Device Class L2=Resistors, Device Class L3="Chip SMD Resistors", Digikey Description="CRGCQ 0805 100K 1%", Height=0.65mm, Ipc Land Pattern Name=RESC200125X55, Lead Free=Yes, Mouser Description="Res Thick Film 0805 100K Ohm 1% 0.125W(1/8W) ±100ppm/C Pad SMD Automotive T/R", Octopart=https://octopart.com/crgcq0805f100k-te+connectivity-91018138, RoHS=TRUE, Series=CRGCQ
R116: library part CMP-02407-009864-1, "RES 1.05K OHM 0.5% 1/5W 0805", Case/Package=0805, Max Operating Temperature=125°C, Max Power Dissipation=125mW, Min Operating Temperature=-55°C, Package Quantity=1000, Resistance=1kR, Temperature Coefficient=25ppm/°C, Tolerance=0.1%, Voltage Rating (DC)=100V, Composition="Thin Film", Contact Plating=Tin, Depth=1.25mm, Height=0.022inch, Lead Free="Lead Free", Length=0.079inch, Military Standard=Not, Number of Terminations=2, Packaging="Tape and Reel", Radiation Hardening=No, Width=0.049inch
R118: library part CMP-250906-233618-1, "RES Thin Film,  2kΩ, 0.1%, 0.1W, 25ppm/°C, 0805"
R301 R302: library part CMP-03412-047577-1, "RES 1kΩ 1.00% 0.2W 0603, AC0603FR-7W1KL"
R303: library part CMP-02407-001090-1, "RES SMD 10K OHM 1% 1/8W 0603, MCT0603HC1002FP500"
R401: library part CMP-03412-008483-2, "RES 10KΩ 1.00% 0.1W 0603, AC0603FR-1310KL", Case/Package=0603, Resistance=10kR, Tolerance=1%, Lead Free="Lead Free", RoHS Compliant=Yes
R402: library part CMP-03412-026926-1, "RES SMD 2.2K OHM 1% 1/10W 0603", Manufacturer=Yageo, Package=RT0603, Power Rating=0.1W, Resistance=2.2KΩ, Temperature="-55°C to +155°C", Temperature Coefficient="25 ppm/°C", Temperature Range High=+155°C, Temperature Range Low=-55°C, Tolerance=0.01, Voltage Rating=75V, Automotive=No, Category=Res, ComponentLink2Description=Datasheet, ComponentLink2URL=http://www.yageo.com/documents/recent/PYu-RT_1-to-0.01_RoHS_L_9.pdf, Composition="Thin Film", Device Class L1="Passive Components", Device Class L2=Resistors, Device Class L3="Chip SMD Resistors", Digikey Description="RES SMD 2.2K OHM 1% 1/10W 0603", Footprint Url=http://www.yageo.com/exep/pages/download/literatures/PYu-R_Mount_10.pdf, Height=0.55mm, Ipc Land Pattern Name=RESC16080X45, Lead Free=Yes, Manufacturer Part Number=RT0603FRD072K2L, Octopart=https://octopart.com/rt0603frd072k2l-yageo-71395345, RoHS=TRUE, Series=RT
R501: library part CMP-03412-029819-2, "RES 562KΩ 1.00% 0.1W 0603", Case Code (Imperial)=0603, Case Code (Metric)=1608, Max Operating Temperature=155°C, Max Power Dissipation=100mW, Min Operating Temperature=-55°C, Resistance=562kR, Resistor Type="Thick Film", Temperature Coefficient=100ppm/°C, Tolerance=1%, Voltage Rating=50V, Case/Package=0603, Features="Moisture Resistant", Height=0.022inch, Length=0.063inch, Number of Terminations=2, Packaging="Tape and Reel", Power Rating=100mW, RoHS Compliant=Yes, Series=AC, Termination=SMD/SMT, Weight=7.1E-05oz, Width=0.8mm
R502: library part CMP-02407-006807-1, "RES Thick Film, 91kΩ, 1%, 0.1W, 100ppm/°C, 0603", Case/Package=0603, Max Operating Temperature=155°C, Max Power Dissipation=100mW, Min Operating Temperature=-55°C, Package Quantity=20000, Resistance=91kR, Temperature Coefficient=100ppm/°C, Tolerance=1%, Composition="Thick Film", Features="Automotive AEC-Q200", Height=0.02inch, Lead Free="Lead Free", Length=0.061inch, Number of Terminations=2, Packaging="Tape and Reel", Width=0.033inch
SW401: library part CMP-2100-03586-2, "SWITCH TACTILE SPST-NO 0.05A 12V", Contact Current Rating=50mA, Contact Resistance=100mR, Insulation Resistance=100MR, Max Operating Temperature=70°C, Max Voltage Rating (DC)=12V, Min Operating Temperature=-25°C, Operating Force=1.5N, Package Quantity=1, Ratings="Dust Proof", Actuator Length=0.4mm, Actuator Type=Standard, Contact Material=Silver, Current Rating=50mA, Depth=2.5mm, Electrical Life=200000Cycles, Height=1.2mm, Illumination Type=Non-Illuminated, Lead Free="Lead Free", Length=4mm, Max Current Rating=50mA, Mechanical Life=200000Cycles, Mount="Surface Mount", Orientation=Straight, Packaging="Tape and Reel", Switch Function=Off-Mom, Switch Travel=0.15mm, Termination=SMD/SMT, Throw Configuration=SPST, Voltage Rating (DC)=12V, Weight=0.000776oz, Width=3mm
SW501: library part CMP-1696-00002-1, "Slide Switch, 500 V, -20 to 70 degC, 3-Pin THD, RoHS", Case\Package=SOT-23-5, Dropout Voltage="300 mV", Max Input Voltage="8 V", Max Operating Temperature="85 degC", Max Ouput Current="150 mA", Max Power Dissipation="250 mW", Min Input Voltage="4.3 V", Min Operating Temperature="-40 degC", Nominal Output Voltage="3.3 V", Package Quantity=3000, ComponentLink1Description="Manufacturer URL", ComponentLink1URL=http://www.e-switch.ch/en/, ComponentLink2Description=Datasheet, ComponentLink2URL=https://www.e-switch.com/system/asset/product_line/data_sheet/119/EG.pdf, DatasheetVersion=Oct-15, Height="1.3 mm", Length="3 mm", Mount="Surface Mount", Output Current="150 mA", Output Voltage="3.3 V", Outputs=1, PackageDescription="3-Pin Through Hole Device, Body 11.6 x 4 mm, Pitch 2.5 mm", PackageReference=EG1218, Packaging="Tape and Reel", Pins=5, Power Rating="250 mW", Radiation Hardening=No, REACH SVHC="No SVHC", RoHSCompliant=true, Width="1.8 mm"
U100: "None", Availability=Unavailable, MF="{'manufacturer': u'Analog Devices Inc.'}", MP=AD8232ACPZ-R7, Package=None, Price=None
U301: "24-bit, 2-kSPS, four-channel, low-power, delta-sigma ADC with PGA, VREF, SPI and two IDACs 16-TSSOP -40 to 125", Manufacturer_Name="Texas Instruments", Copyright="Copyright (C) 2026 Ultra Librarian. All rights reserved.", Datasheet=https://www.ti.com/lit/gpn/ads1220, Manufacturer_Part_Number=ADS1220IPW, RefDes=RefDes, Type=Type
U302: "650-nA quiescent current, 12-ppm/Â°C drift, ultra-low-power precision voltage reference 6-SOT-23 -40 to 125", Manufacturer_Name="Texas Instruments", Copyright="Copyright (C) 2026 Ultra Librarian. All rights reserved.", Datasheet=https://www.ti.com/lit/gpn/ref35, Manufacturer_Part_Number=REF35250QDBVR, RefDes=RefDes, Type=TYPE
U401: library part MDBT42Q, "MDBT42Q"
U501: "1.5-V to 5.5-V, 1.5-A, 0.5-ÂµA IQ ideal diode with integrated FET 6-SC70 -40 to 125", Manufacturer_Name="Texas Instruments", Copyright="Copyright (C) 2025 Ultra Librarian. All rights reserved.", Manufacturer_Part_Number=LM66100DCKR, RefDes=RefDes, Type=Type
U502: library part CMP-04918-000005-1, "IC POWER MANAGEMENT", Manufacturer="Texas Instruments", Max Junction Temp=+125°C, Max Supply Voltage=5.5V, Min Supply Voltage=1.3V, Nominal Supply Current=11uA, Output Current=2A, Output Voltage=1.8-5.2V, Package=DLA0010A, Switching Frequency=1.4/1.6/2.1MHz, Temperature="-40°C to +125°C", Temperature Range Low=-40°C, Automotive=No, Category=IC, ComponentLink2Description=Datasheet, ComponentLink2URL=https://www.ti.com/lit/ds/symlink/tps63802.pdf, Device Class L1="Integrated Circuits (ICs)", Device Class L2="Power Management ICs", Device Class L3="Voltage Regulators - Switching", Digikey Description="IC POWER MANAGEMENT", Height=1mm, Lead Free=Yes, Manufacturer Part Number=TPS63802DLAR, Max Duty Cycle=100%, Mouser Description="2-A, high-efficient, 11-µA quiescent current buck-boost converter in QFN/DFN package 10-VSON-HR -40 to 125", Number Of Outputs=1, Octopart=https://octopart.com/tps63802dlar-texas+instruments-97359678, Output Type=AdjustableProgrammable, RoHS=TRUE, Standoff Height=0mm, Switching Topology=Buck-Boost, Temperature Range High=+125°C
U503 U504: library part CMP-04917-000300-1, "IC REG LINEAR 3.3V 300MA SOT23-5", RoHS Compliant=Yes

## Via types
v1: diameter 27.56, hole 11.81, Top Layer to Bottom Layer, 52 vias
v2: diameter 50, hole 28, Top Layer to Bottom Layer, 13 vias